# Altium PCB SBH_MCU.PcbDoc (part 2 of 2)
Units mm, origin at the board's own origin, x right, y up, seen from the top; angles counter-clockwise.
Board outline 53.97 x 54.34 mm, 4 copper layers (Top Layer, Mid Layer 1, Mid Layer 2, Bottom Layer), stack 1.57 mm thick; 82 components, 76 nets, 307 pads, 113 vias.
Unrouted connection lines stored in the file: 14.
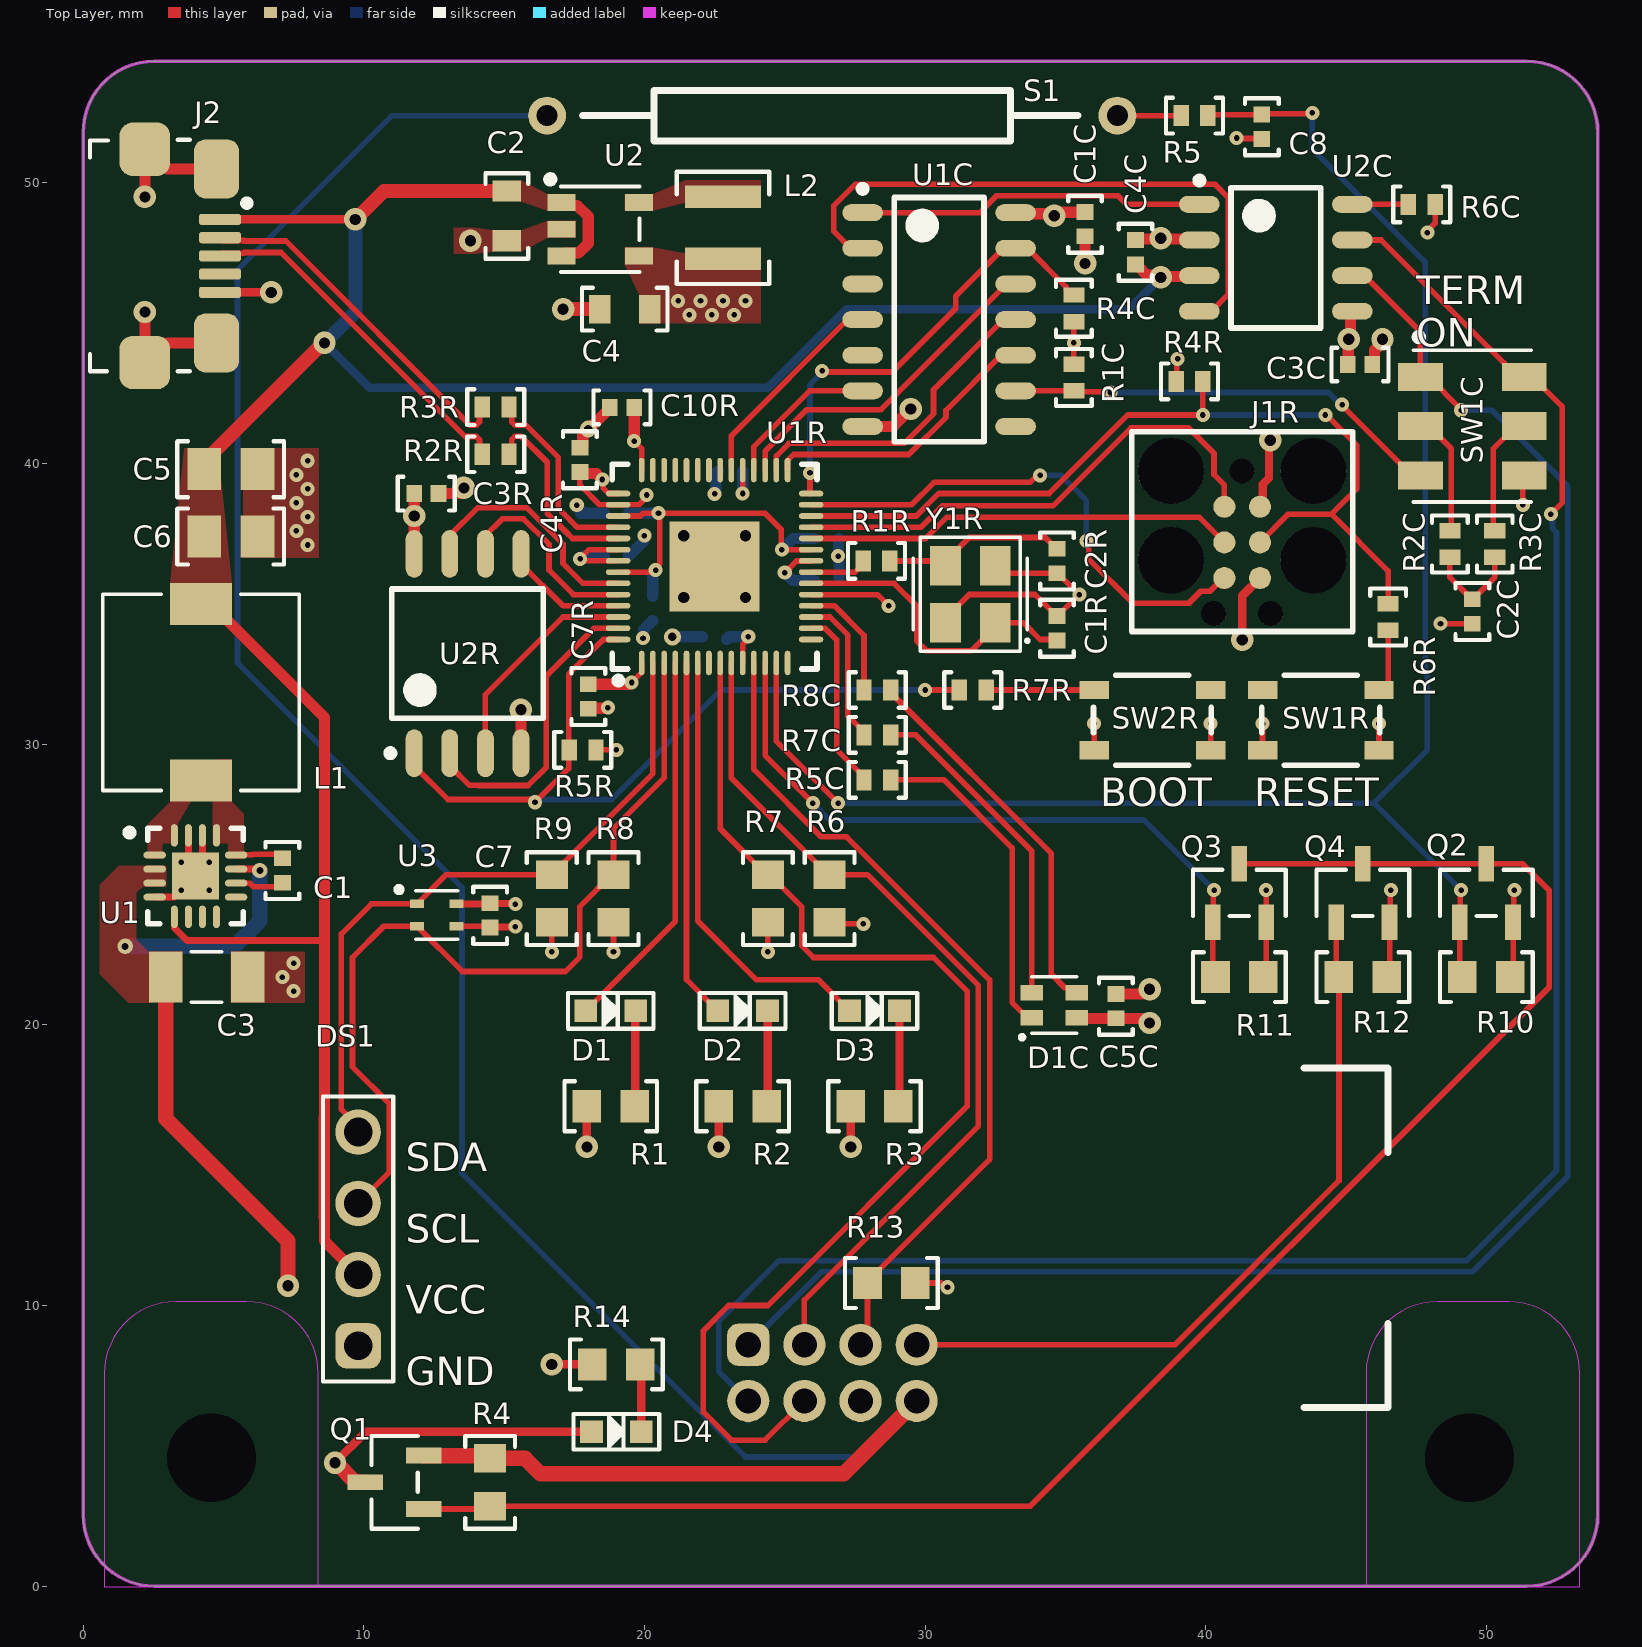
[diagram p0: Top Layer view]

## Silkscreen, mask and mechanical layers (free items; w line width, h text height) (continued)
Mechanical 11: (continued)
  lines w0.127: 12.175,7.182 ccw(c17.255,7.182) 17.255,2.102 37.095,2.102 ccw(c37.095,7.182) 42.175,7.182 42.175,17.342 ccw(c37.095,17.342) 37.095,22.422 17.255,22.422 ccw(c17.255,17.342) 12.175,17.342 12.175,7.182

## Text inside footprints (layer, text, board x,y; h text height)
DS1: Top Overlay "GND" at 11.5,7.163 h1.02; Top Overlay "VCC" at 11.5,9.703 h1.02; Top Overlay "SCL" at 11.5,12.243 h1.02; Top Overlay "SDA" at 11.5,14.783 h1.02